# Altium PCB STM32H743I-EVAL2PCBDESIGN.PcbDoc (part 19 of 23)
Units mil, origin at the board's own origin, x right, y up, seen from the top; angles counter-clockwise.
Board outline 6558 x 5417 mil, 8 copper layers (L1_TOP, L2_GND, L3_HS1, L4_POWER, L5_SIG, L6_HS2, L7_GND, L8_BOTTOM), stack 61.368 mil thick; 620 components, 588 nets, 2945 pads, 1724 vias.
Unrouted connection lines stored in the file: 1.
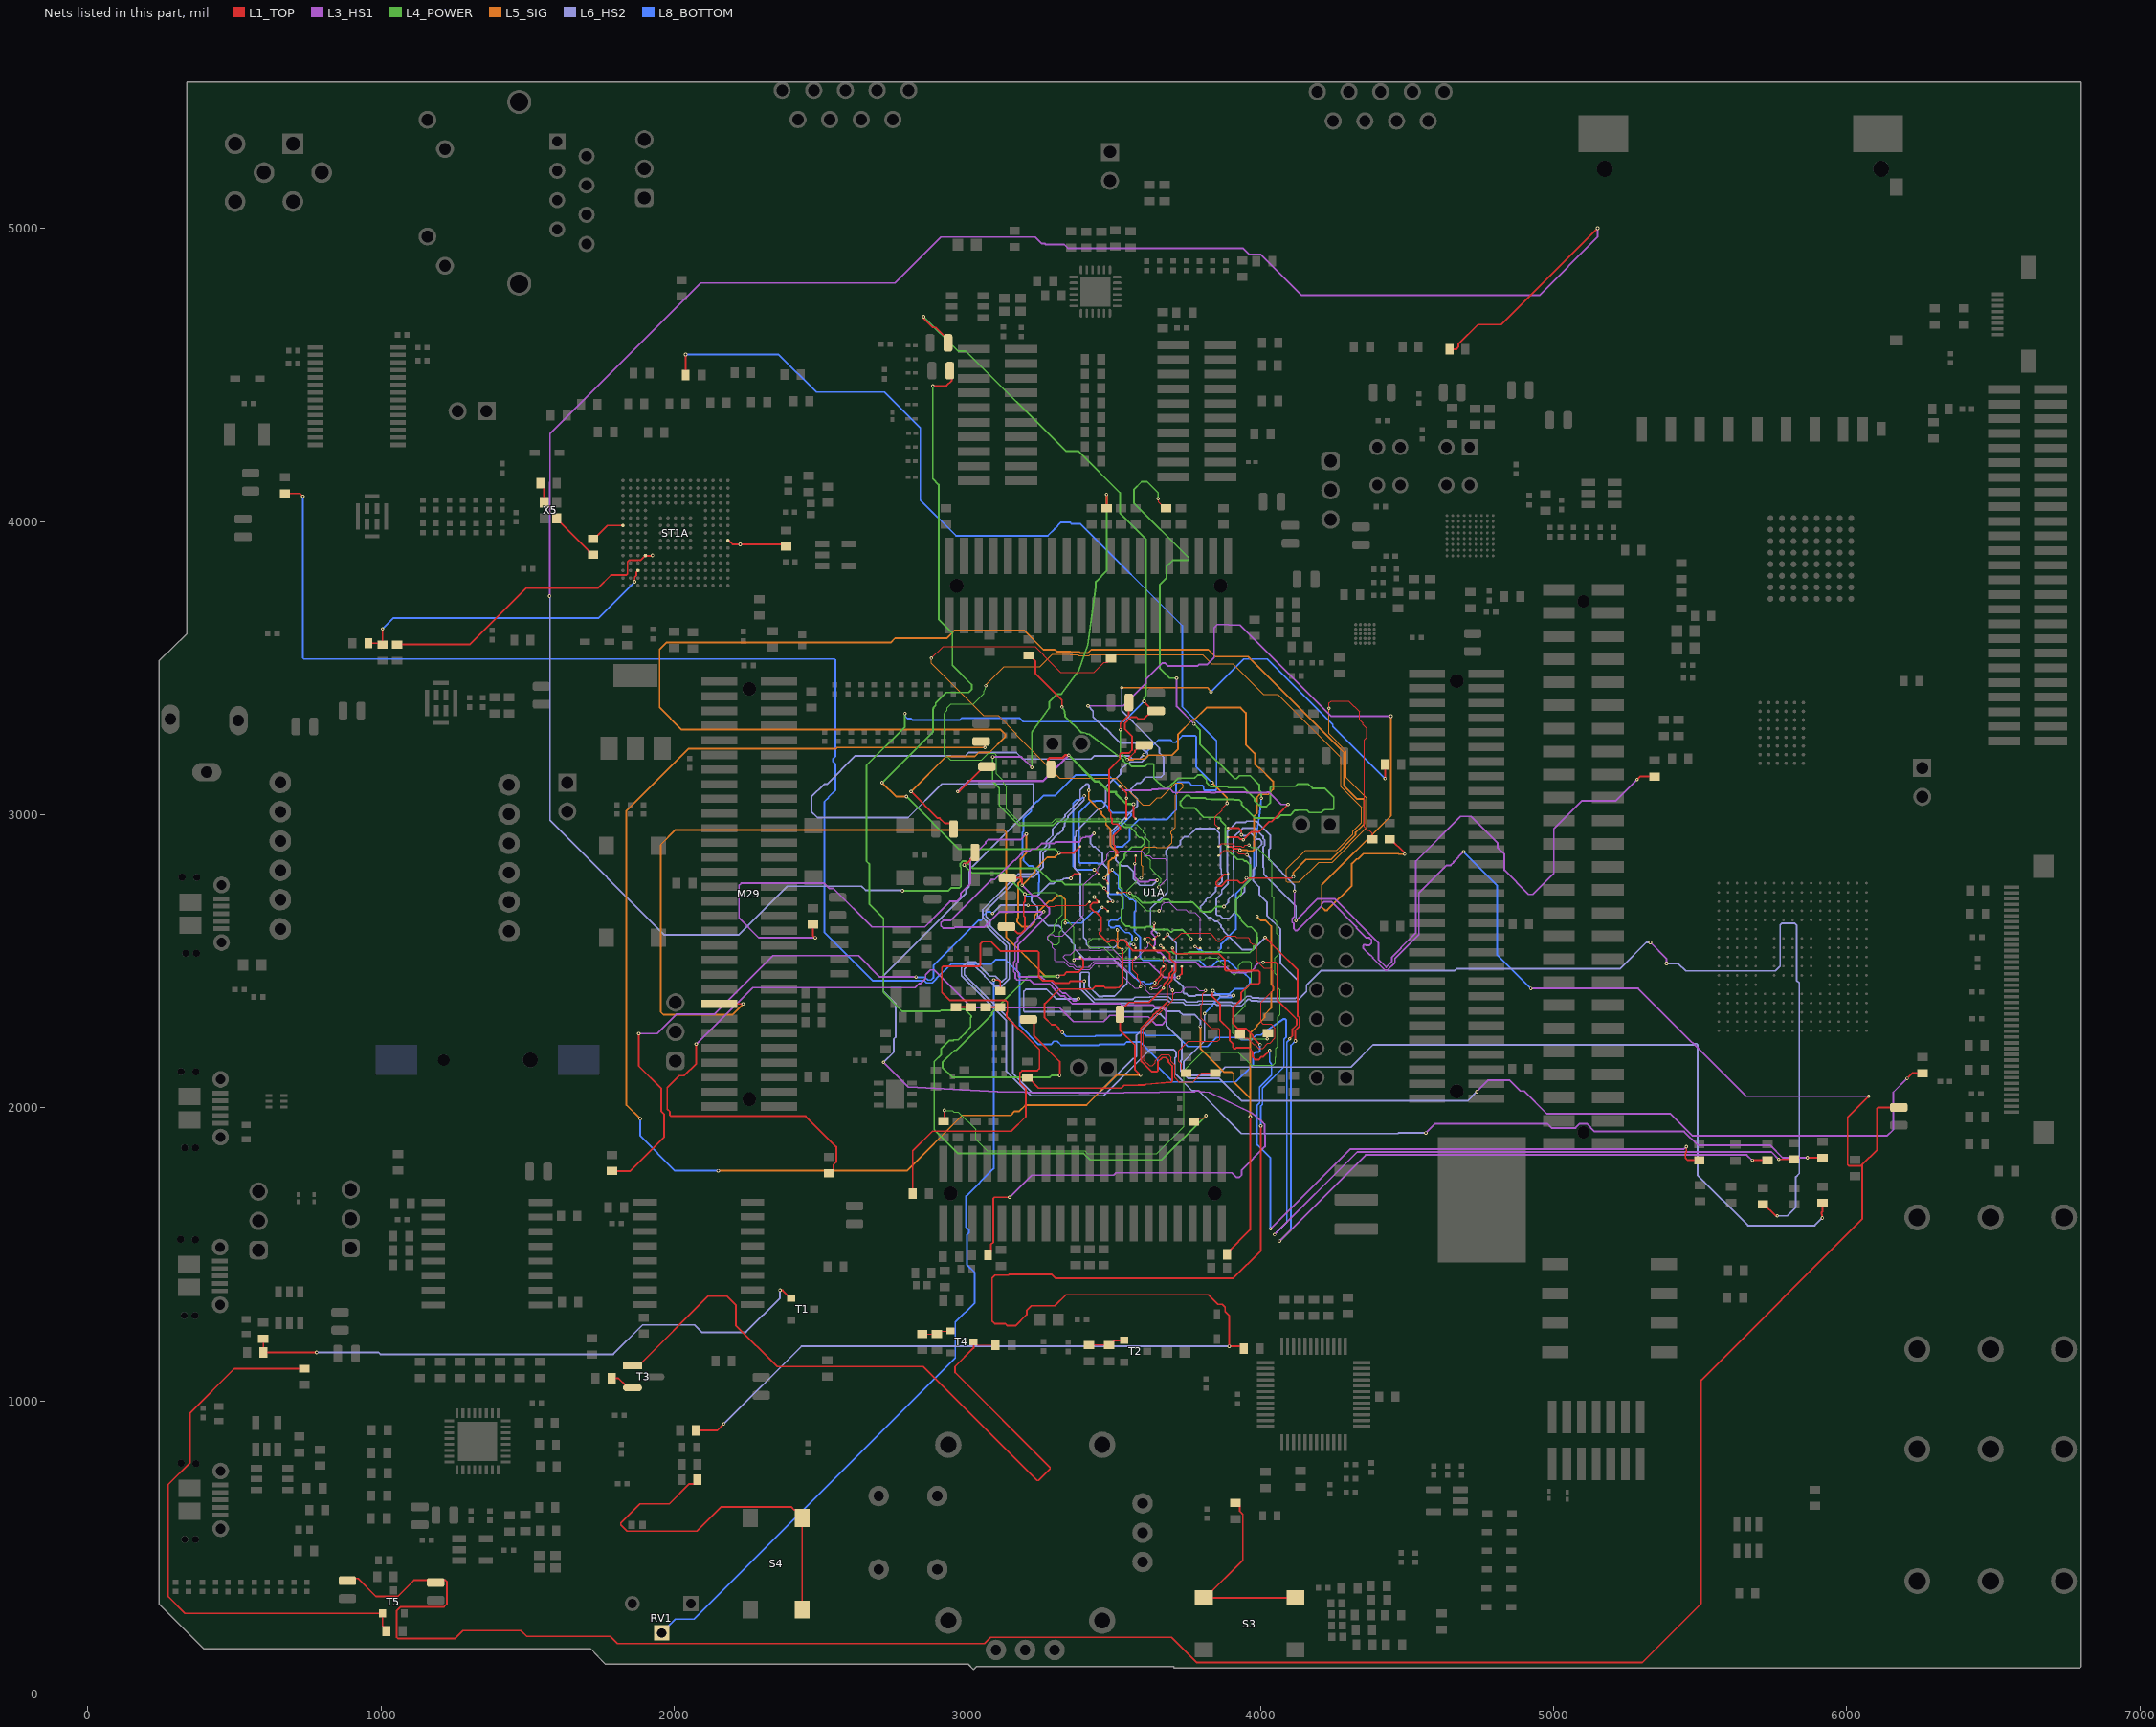
[diagram p16: the nets of this part, all layers, seen from the top]

## Via types
v1: diameter 12, hole 6, L1_TOP to L8_BOTTOM, tented both sides, 1724 vias

## Nets (pads, with @x,y where several pads share a name; then routed paths per layer and width w, separated by ;. In a path a pad name is that pad's centre, name@x,y a point inside that pad or via, vN(x,y) a via of type N, cw(c..) or ccw(c..) an arc to the next point about the centre after c; other vN are vias at no path point) (continued)
NetR54_2: R54.2 U1A.P13 | length 2554.8
  L1_TOP w6: R54.2@3475,4045.56 v1(3475,4093)
  L3_HS1 w6: v1(3087,3197) 3184.4,3197 v1(3220,3161.4)
  L4_POWER w6: v1(3087,3197) 3085.9,3195.9 3085.9,3113.1 3109,3090 3109,3030.82 3175.82,2964 3291.47,2964 3304.47,2977 3517.27,2977 3537.27,2957 3556.83,2957 3575.99,2937.84 3575.99,2932.57 3586.36,2922.2 3593.19,2922.2 3603.55,2911.84 3603.55,2901.07 3592.35,2889.87 3561.01,2889.87 3536,2864.86 3536,2851.38 3519.02,2834.41 3519.02,2754.62 3528,2745.64 3528,2721.82 3530.21,2719.61 3530.21,2680.6 3526,2676.38 3526,2634.61 3538.38,2622.23 3541.62,2619 3553.76,2619 3557.76,2615 3608.38,2615 3611.31,2617.92 3611.31,2618 3630.17,2618 3640.17,2608 3685.36,2608 3693.5,2599.86 3698.47,2599.86 3705.62,2607 3734.65,2607 3755.05,2586.6 3755.05,2586.1 3763,2578.15 v1(3763,2576.53) ; v1(3220,3161.4) 3220,3281.51 3278.89,3364.2 ccw(c3274,3367.68) 3280,3367.68 3280,3385.49 3305.19,3410.68 3319.36,3410.68 ; 3319.39,3410.68 3322.91,3414.19 3380,3491.62 3411,3579.62 3438,3776.12 3438,3794.38 3439.76,3796.14 3475,3831.38 v1(3475,4093)
NetR55_1: R55.1 U1A.P9 | length 4081.1
  L1_TOP w2: U1A.P9@3637.02,2576.53 v1(3651.98,2591.5)
  L1_TOP w6: v1(4016,2581) 4055.79,2541.21 4056.17,2541.21 4127,2470.38 4127,2312.56 4133.45,2306.12 4133.45,2278.78 4119,2264.33 v1(4119,2228) ; v1(5678.12,1820.88) R55.1@5730,1820.88
  L3_HS1 w6: v1(4065,1545) 4359,1839 5659.31,1839 5677.43,1820.88 v1(5678.12,1820.88)
  L6_HS2 w6: v1(3651.98,2591.5) 3624.54,2618.94 3624.54,2679.93 3651.91,2707.29 3654.68,2707.29 3682.04,2734.65 3682.04,2843.33 3681.48,2843.89 3681.48,2859.4 3678,2862.88 3678,2878.38 3688.62,2889 3716.66,2889 3727.03,2899.37 3727.03,2911.73 3740.26,2924.95 3752.86,2924.95 3780.9,2953 3844.3,2953 3860,2937.3 3860,2899.23 3863.96,2895.27 3863.96,2816.57 3866.48,2814.05 3866.48,2798.05 3869,2795.53 3869,2772.43 3848,2751.43 3848,2739.62 3825.38,2717 3820.62,2717 3813,2709.38 3813,2704.62 3800.41,2692.02 3800.41,2691.79 3795,2686.38 3795,2675.62 3821.54,2649.07 3830.5,2649.07 3843.57,2636 3852.53,2636 3866,2622.53 3866,2615.57 3874.43,2607.14 3874.43,2602.96 3938.38,2539 3974,2539 v1(4016,2581)
  L8_BOTTOM w6: v1(4065,1545) 4104,1584 4104,2213 v1(4119,2228)
NetR56_1: R56.1 SB13.1 SB14.1 U1A.D1 | length 5871.1
  L1_TOP w6: v1(2882,4463) 2928.31,4463 2947,4481.69 2947,4508 SB13.1@2940,4515 ; SB14.1@3137,2784 3182.73,2784 3187,2779.73 v1(3187,2759) ; v1(3313,2869) 3362.56,2869 U1A.D1@3385.05,2891.49 ; R56.1@3885.56,1500 3885.56,1503.94 3965,1583.38 v1(3965,1968.98)
  L3_HS1 w6: v1(3187,2759) 3223,2723 3237.38,2723 3279.32,2681.06 3279.32,2661.71 3173,2555.38 3173,2497 3168,2492 3168,2468.62 3174,2462.62 3174,2449.51 3177.51,2446 3253,2446 3265,2434 3282.81,2434 3314.62,2402.19 3314.62,2400.52 3324.14,2391 3335.66,2391 3361.66,2365 3372,2365 v1(3378.89,2371.89)
  L4_POWER w6: v1(2709.09,3109.09) 2883,3283 2883,3332.67 2883,3361.15 2884,3362.15 2884,3364.88 2892,3372.88 2892,3381.27 2927.73,3417 3004.38,3417 3014.74,3427.36 3014.74,3443.83 2949,3509.57 2949,3619 2902,3666 2902,4126.01 2882,4146.01 v1(2882,4463) ; v1(2792,3062) 2972,2882 3300,2882 v1(3313,2869)
  L5_SIG w6: v1(2709.09,3109.09) 2756.17,3062 v1(2792,3062) ; v1(3187,2759) 3230.57,2802.57 3230.57,2812.57 3273,2855 3299,2855 v1(3313,2869) ; v1(3795,2278) 3795,2202 3875,2122 3901.38,2122 3909,2114.38 3909,2088 3965,2032 ; v1(3965,1968.98) 3965,2032 ; v1(3989,2653) 3989,2651.38 3997.14,2643.24 3997.14,2642.86 4001.38,2638.62 4017.77,2638.62 4037,2619.38 4037,2419.38 4044.15,2412.24 4044.15,2401.47 4037,2394.32 4037,2340.62 4014,2317.62 4014,2307.23 3988,2281.23 3988,2277.47 3965,2254.47 3965,2032
  L6_HS2 w6: v1(3378.89,2371.89) 3302.49,2371.89 3270.38,2404 3199.62,2404 3192,2396.38 3192,2330.51 3195.51,2327 3628.33,2327 3640.33,2339 3667.67,2339 3677.67,2329 3723,2329 3724.98,2327.02 3734,2318 3775,2318 3795,2298 v1(3795,2278)
NetR57_2: R57.2 U1A.P14 | length 2695.5
  L1_TOP w2: v1(2877,3534) 2917.22,3574.22 3230.93,3574.22 3261,3544.15 3261,3542.44 3317.44,3486 3432.13,3486 3465.79,3519.66 3477.22,3519.66 R57.2@3490,3532.44
  L3_HS1 w2: v1(3654,2672) 3661.51,2679.51 3661.51,2684.76 3663.25,2690.41 3664.43,2691.59 3673.84,2701 3686,2701 3687.17,2702.17 3688.83,2702.17 3714.51,2676.49 3745.07,2676.49 3755.56,2666 3776.56,2666 3794.5,2648.06 v1(3794.5,2576.53)
  L4_POWER w2: v1(3592.92,2784) 3591,2782.09 3584.92,2782.09 3546,2743.17 3546,2741 3544,2739 3544,2728.44 3550.44,2722 3551,2722 3558,2715 3568.87,2715 3611.87,2672 v1(3654,2672)
  L5_SIG w2: v1(2877,3534) 2877,3516 3055,3338 3104.98,3338 3166.49,3276.49 3166.49,3272.51 3314,3125 3507.56,3125 3553,3079.56 3553,3079.44 3598.44,3034 3623.56,3034 3647.56,3058 3660.98,3058 3711.98,3109 3729.56,3109 3736,3102.56 3736,3093.44 3709,3066.44 3709,2956.56 3695,2942.56 3695,2933.44 3698.72,2929.72 3698.72,2904.82 3681.9,2888 3665,2888 3664.46,2887.46 3645.1,2887.46 3643.56,2889 3605.44,2889 3594,2877.56 3594,2828.44 3599,2823.44 3599,2790.64 3592.92,2784.56 v1(3592.92,2784)
NetR58_1: R58.1 U1A.N9 | length 3472.2
  L1_TOP w4: U1A.N9@3637.02,2608.02 v1@3637.02,2628.49
  L1_TOP w6: v1(4009,2496) 4051,2496 4057.72,2489.28 4057.72,2367.7 4123.45,2301.97 4123.45,2290.16 4123.45,2282.92 4109,2268.47 4109,2245.62 4100,2236.62 v1(4100,2235) ; v1(5768.12,1823.88) R58.1@5820,1823.88
  L3_HS1 w6: v1(3637.54,2629.02) 3637.54,2609.58 3628.98,2601.02 3628.98,2594.54 3640,2583.53 3640,2555.47 3636,2551.47 3636,2543.47 3649.47,2530 3657.86,2530 3690.86,2497 3749.33,2497 3750.33,2498 3777.67,2498 3795.67,2480 3882.72,2480 3901.72,2461 3931.86,2461 3951.8,2461 3954.8,2464 3967.53,2464 3981,2477.47 3981,2481.63 3994.22,2494.85 4007.85,2494.85 v1(4009,2496) ; v1(4048,1567) 4330,1849 5743,1849 v1(5768.12,1823.88)
  L8_BOTTOM w6: v1(4048,1567) 4090,1609 4090,2223.79 4100,2233.79 v1(4100,2235)
NetR59_2: R59.2 U1A.R14 | length 2265.3
  L1_TOP w2: v1(3777,2550) 3779.71,2550 3784.67,2545.03 U1A.R14@3794.5,2545.03
  L1_TOP w4: v1(3651,4078) 3652.53,4076.47 3652.53,4067.09 3674.06,4045.56 R59.2@3678,4045.56
  L3_HS1 w6: v1(3714,3466) 3714,3369 v1(3773,3310)
  L4_POWER w6: v1(3651,4078) 3651,4098.53 3613.53,4136 3594.47,4136 3568,4109.53 3568,4063.62 3755.13,3876.49 3755.13,3871.51 3751.62,3868 3700.62,3868 3678.81,3846.19 3678.81,3807.42 3657,3785.62 3657,3498.62 3689.62,3466 v1(3714,3466) ; v1(3773,3310) 3793.38,3289.62 3793.38,3241 3911.38,3123 3918.47,3123 3928.47,3133 3965.19,3133 3996.01,3102.18 3996.01,3083.4 4003,3076.41 v1(4003,3056)
  L8_BOTTOM w6: v1(3777,2550) 3777.44,2550 3787.83,2539.62 3796.86,2539.62 3805.47,2531 3852.53,2531 3866,2544.47 3866,2558.62 3915.78,2608.39 3915.78,2729.39 3978,2791.62 3978,2909.38 3982.25,2913.63 3984.01,2915.39 3998.01,3006.77 4000.77,3035.77 4000.77,3040.15 4001.85,3041.23 4001.85,3054.85 v1(4003,3056)
NetR60_1: R60.1 U1A.P10 | length 3590.7
  L1_TOP w2: U1A.P10@3668.51,2576.53 v1(3683.48,2591.5)
  L1_TOP w6: v1(5917,1624) 5915.85,1625.15 5915.85,1635.56 5913.86,1637.56 5913.86,1642 5917,1645.14 R60.1@5917,1675.88
  L6_HS2 w6: v1(3683.48,2591.5) 3713.01,2561.97 3713.01,2503.8 3707,2497.79 3707,2439.62 3721.12,2425.5 3722.88,2425.5 3737,2411.38 3737,2392.51 3740.51,2389 3747.85,2389 3755.85,2381 3776.9,2381 3779.9,2384 3859.64,2384 3863.64,2380 3887.01,2380 3890.01,2383 v1(3908,2383) ; v1(3809,2321) 3809,2227.67 3738,2156.67 3738,2129.33 3757.33,2110 3851,2110 3880,2139 4308.62,2139 4384.62,2215 5479,2215 5482.51,2218.51 5487.49,2218.51 5491,2215 5491,1770 5663,1598 5891,1598 v1(5917,1624)
  L8_BOTTOM w6: v1(3809,2321) 3837.07,2349.07 3837.07,2352.07 3861,2376 3899.38,2376 3906.38,2383 v1(3908,2383)
NetR61_2: R61.2 U1A.D16 | length 2455.7
  L1_TOP w4: R61.2@2919,1954.56 2921,1956.56 v1(2921,1991) ; U1A.D16@3857.49,2891.49 3866.49,2900.49 3904.61,2900.49 3911.6,2893.5 3932.73,2893.5 3936.23,2890 3942.84,2890 3948.6,2895.76 3960.36,2895.76 v1(3960.6,2896)
  L4_POWER w4: v1(2921,1991) 2948.72,1991 2953.72,1986 2968.69,1986 3028.66,1926.03 3028.66,1892.03 3067.69,1853 3400.73,1853 3410.07,1843.66 3645.62,1843.66 3739,1937.04 3739,2127.97 3801.03,2190 3924,2190 3969,2145 4043.31,2145 4051.41,2153.1 4051.41,2173.14 4052,2173.73 4052,2201.97 4059,2208.97 4059,2310.4 4067.15,2318.54 4067.15,2401.48 4059.15,2409.48 4059.15,2448.22 4049,2458.36 4049,2511.25 4054,2516.25 4062.5,2524.75 4062.5,2588.33 4056,2594.83 4056,2635.05 4046,2645.05 4046,2715.1 4039,2722.1 4039,2837 3987.88,2888.12 3968.48,2888.12 v1(3960.6,2896)
NetR62_1: R62.1 U1A.R10 | length 3172.6
  L1_TOP w2: v1(3659,2553) 3659.77,2553 3667.74,2545.03 U1A.R10@3668.51,2545.03
  L1_TOP w6: R62.1@3209,3543.44 3212.94,3543.44 3231.82,3524.56 3231.82,3482.04 3323,3390.86 v1(3323,3367.68)
  L4_POWER w6: v1(3323,3367.68) 3332.14,3352.47 3333,3335.43 3387.46,3280.97 cw(c3389,3242) 3409.24,3275.34 3416.45,3274.15 3530.59,3188.87 3533,3186.46 3533,3182.62 3540.62,3175 3549.77,3175 3559.77,3165 3606.38,3165 3614.58,3173.19 3632.68,3173.19 3636.19,3169.68 3636.19,3125.19 3671.61,3089.77 3684.24,3089.77 3719.47,3125 3775.47,3125 3785.47,3135 3800.53,3135 3816,3119.53 3816,3109.62 3829.62,3096 3886.62,3096 3890.62,3092 3942.95,3092 3980,3054.95 3980,3046.47 3993.47,3033 3996.47,3033 4001.47,3028 4020.53,3028 4034,3041.47 4034,3093.49 4037.51,3097 4119.55,3097 4126.55,3104 4163.53,3104 4177.53,3090 4219,3090 4250,3059 4250,3020.51 4246.49,3017 4218.58,3017 4216.91,3015.33 4215.48,3015.33 4207.14,3007 4167.42,3007 4159.09,3015.33 4126.86,3015.33 4126.53,3015 4118.15,3015 4101.15,2998 4068.33,2998 4058.33,2988 3981.9,2988 3936.01,3033.9 3936.01,3042.38 3928.39,3049.99 3910.39,3049.99 3908.38,3052 3834.38,3052 3833.38,3053 3816.05,3053 3812.05,3057 3764.39,3057 3756.38,3065 3745.62,3065 3739.1,3058.48 3739.1,3057.31 3727,3045.21 3727,3032.61 3736.62,3023 3774.3,3023 3806.3,2991 3859.23,2991 3864.5,2985.73 3864.5,2979.23 3881,2962.73 3881,2955.27 3880,2954.27 3880,2898.53 3886.11,2892.42 3886.11,2882.14 3921.24,2847 3932.03,2847 3940.3,2847 3945.3,2842 3951.38,2842 3965,2828.38 3965,2777.39 3935,2747.39 3935,2729.53 3915.78,2710.31 3915.78,2664.96 3918,2662.74 3918,2662.62 3931.37,2649.24 3931.37,2647.1 3935,2643.47 3935,2637.87 3955.87,2617 3968.39,2617 3989,2596.38 3989,2582 3990,2581 3990,2563.81 3977,2550.81 3977,2542.47 3963.53,2529 3869.43,2529 3867.43,2531 3840.15,2531 3839.15,2532 3806.85,2532 3805.85,2531 3755.61,2531 3751.61,2527 3738.52,2527 3737.29,2525.77 3704.09,2525.77 3697.84,2532.03 3679.97,2532.03 v1(3659,2553)
NetR63_1: R63.1 SB15.1 SB16.1 U1A.E5 | length 6299.9
  L1_TOP w4: R63.1@3772,1952.56 3783.78,1964.34 3805.34,1964.34 v1(3814,1973)
  L1_TOP w6: v1(2851,4699) 2851,4693 2881.5,4662.5 2891.84,4662.5 2934,4620.34 SB15.1@2934,4610 ; U1A.E5@3511.03,2859.99 3511.03,2876.82 3502.6,2885.25 3502.6,2894.01 3498,2898.62 3498,2926.78 3521.03,2949.81 3521.03,2958.62 3511.68,2967.98 3496.55,2967.98 3493.03,2971.49 3493.03,2986.62 3489.54,2990.12 3489.54,3007.09 3484,3012.63 3484,3154.38 3520.47,3190.86 3520.47,3206.68 3523.99,3210.2 3551.67,3210.2 3561.63,3220.16 3561.63,3268.1 3537,3292.73 3537,3311.38 3558.62,3333 3576.62,3333 3583.66,3325.96 3600.96,3325.96 3629,3354 SB16.1@3633.66,3354 ; v1(3603,3387) 3604.96,3385.04 3604.96,3382.7 SB16.1@3633.66,3354 ; SB16.1@3644,3354 SB16.1@3633.66,3354
  L4_POWER w6: v1(2787,3345) 2787,3300 2656,3169 2656,2840.67 2666.16,2830.51 2666.16,2693.7 2714,2645.86 2714,2393 2778,2329 2906.67,2329 2909.67,2332 2941.81,2332 2945.81,2336 2990.59,2336 3013.51,2313.07 3013.51,2309.51 3011,2307 3011,2275.19 2998.91,2263.09 2998.91,2260.91 2977.19,2239.19 2975.9,2239.19 2968.42,2231.71 2954.33,2231.71 2951.62,2229 2937.47,2229 2911,2202.53 2911,2181.62 2887,2157.62 2887,1925 2968,1844 3397,1844 3419,1822 3663,1822 v1(3814,1973) ; v1(2851,4699) 2968.38,4581.62 2994.75,4581.62 3335.62,4240.75 3378.64,4240.75 3521,4098.38 3521,4028.53 3609,3940.53 3609,3406.5 3603,3400.5 v1(3603,3387)
  L8_BOTTOM w6: v1(2787,3345) 2788.15,3343.85 2788.15,3335.31 2795.46,3328 2808,3328 2813,3323 2974.14,3323 2981.14,3330 3097.53,3330 3098.24,3329.28 3179.1,3329.28 3190.77,3317.62 3533.62,3317.62 v1(3603,3387)
NetR64_2: R64.2 U1A.B17 | length 3636.1
  L1_TOP w6: R64.2@2813.44,1707 2813.44,1852.44 2881.22,1920.22 3149.9,1920.22 3199.57,1969.89 3199.57,2065.48 3179.28,2085.76 3179.28,2119.12 3186.72,2126.56 3238.56,2126.56 3246,2134 3246,2198.35 3133.78,2310.57 3133.78,2323.83 3136.72,2326.76 3136.72,2360.12 3130.84,2366 2941,2366 2913,2394 2913,2478.77 2916.51,2482.28 3040.77,2482.28 3044.28,2485.8 3044.28,2558.77 3052.51,2567 3080.75,2567 3112.75,2535 3238.63,2535 3244,2529.63 3244,2446.14 3257.14,2433 3291.47,2433 3299.47,2425 3344.92,2425 3351.92,2432 v1(3399,2432) ; U1A.B17@3888.98,2954.48 3924.45,2954.48 3934.85,2944.08 v1(3934.85,2931.15)
  L6_HS2 w6: v1(3399,2432) 3399,2405.62 3434.62,2370 3564.86,2370 3571.86,2377 3621.76,2377 3623.76,2379 3685.86,2379 3691.86,2373 3692.1,2373 3696.1,2369 3739.57,2369 3747.57,2361 3785.19,2361 3788.19,2364 3851.36,2364 3855.36,2360 3901.81,2360 3904.81,2357 3930.05,2357 3953.66,2380.62 3966,2380.62 3971.62,2375 3993.81,2375 3995.81,2373 4119.38,2373 4127,2380.62 4127,2433.62 4068,2492.62 4068,2609.86 4022,2655.86 4022,2701.38 3996,2727.38 3996,2753.38 3975,2774.38 3975,2813.14 3987,2825.14 3987,2881.62 4004,2898.62 4004,2909.38 3996.38,2917 3987.38,2917 3967.46,2936.93 3962.49,2936.93 3953.38,2927.83 3942.62,2927.83 3940.44,2930 3936,2930 v1(3934.85,2931.15)
NetR66_1: R66.1 U1A.T10 | length 867.7
  L1_TOP w4: v1(3626,2406) 3634.78,2414.78 3643.75,2414.78 3651.15,2422.18 3651.15,2426.42 3653,2428.27 3653,2430.89 3656,2433.89 3656,2434.57 3668,2446.57 3668,2463.71 3677,2472.71 3677,2474.13 3677.51,2474.65 3677.51,2485.77 3668.51,2494.77 U1A.T10@3668.51,2513.54 ; v1(3700,2401) 3701,2400 3701,2367.54 3651.46,2318 3649.03,2318 3642,2310.97 3642,2308.54 3601,2267.54 3601,2210.87 3602.28,2209.59 3602.28,2161.75 3621.03,2143 3630.97,2143 3641.09,2153.11 3641.09,2159.87 3661.89,2180.67 3686.33,2180.67 3695.45,2171.55 3695.45,2158.67 3708,2146.12 3708,2102.32 3721.66,2088.66 3770.34,2088.66 3800.12,2118.44 R66.1@3846,2118.44
  L3_HS1 w4: v1(3626,2406) 3650.03,2406 3664.03,2420 3688.66,2420 3691,2417.66 3691,2410 v1(3700,2401)
NetR68_2: R68.2 U1A.B16 | length 6539.4
  L1_TOP w4: U1A.B16@3857.49,2954.48 3845,2966.97 3845,2992.26 3868.85,3016.11 3868.85,3021.26 3886,3038.41 v1(3886,3039)
  L1_TOP w6: R68.2@3070.56,1498 3079.88,1507.32 3079.88,1532.47 3089,1541.58 3089,1691.49 3092.51,1695 v1(3144.26,1695)
  L3_HS1 w6: v1(2714,2155) 2798.24,2070.76 3102.86,2055.01 3103.02,2055 3382.02,2050 3415.98,2050 3775.62,2055 3778.62,2058 3789.38,2058 3792.38,2055 3825.67,2052 3970.38,1981.98 4006.53,1951.14 4014.14,1943.53 4015.24,1872.21 4015.24,1867.24 3936,1788 3936,1770.62 3928.38,1763 3917.62,1763 3902.69,1777.92 3507.32,1777.92 3499.4,1770 3219.26,1770 v1(3144.26,1695)
  L5_SIG w6: v1(3835,3109) 3886,3058 v1(3886,3039)
  L6_HS2 w6: v1(2714,2155) 2749,2190 2749,2234.38 2756,2241.38 2756,2354.05 2714,2396.05 2714,2450.86 2996,2732.86 2996,2744.12 3006,2754.12 3006,2811.84 3226,3031.84 3226,3101.49 3222.49,3105 2912.98,3105 2797.98,2990 2488.47,2990 2468,3010.47 2468,3060.38 2511.62,3104 2521,3104 2618,3201 2944.62,3201 2946.62,3199 2991.5,3199 3004.5,3212 3166.94,3212 3188.94,3190 3422.38,3190 3433.38,3201 3551.38,3201 3562.38,3190 3587,3190 v1(3602,3205)
  L8_BOTTOM w6: v1(3602,3205) 3651.62,3254.62 3693,3254.62 3700.62,3247 3711.38,3247 3733.38,3269 3777.49,3269 3781,3265.49 3781,3163 v1(3835,3109)
NetR69_1: R69.1 U1A.U10 | length 4761.6
  L1_TOP w6: R69.1@2038.88,4500 2039,4500.12 v1(2039,4570) ; v1(3639,2427) 3639,2428.62 3644,2433.62 3644,2434.62 3647,2437.62 3647,2438.3 3659,2450.3 3659,2472.53 U1A.U10@3668.51,2482.04
  L8_BOTTOM w6: v1(2039,4570) 2356.47,4570 2484.64,4441.83 2717.55,4441.83 2839.44,4319.94 2839.44,4073.39 2961.33,3951.5 3274.53,3951.5 3298,3974.97 3298,3975.88 3319.62,3997.5 3350,3997.5 3355.5,3992 3385.88,3992 3733.23,3644.65 3733.23,3368.16 3850,3251.38 3850,3086.51 3846.49,3083 3809.51,3083 3806,3086.51 3806,3095.49 3802.49,3099 3767.05,3099 3755.05,3111 3719.62,3111 3712,3103.38 3712,3068.64 3713,3067.64 3713,3016.33 3679.67,2983 3584.16,2983 3554,2952.84 3554,2914.51 3530.49,2891 3505.62,2891 3498,2898.62 3498,2936.53 3558.99,2997.52 3558.99,3002.49 3555.47,3006 3495.47,3006 3478,3023.47 3478,3028.38 3459.38,3047 3437.53,3047 3436.53,3046 3420,3046 3381,3007 3381,2838.48 3384.51,2834.97 3442.6,2834.97 3444.57,2833 3462.38,2833 3481.5,2813.88 3481.5,2735.02 3487.73,2728.8 3522.2,2728.8 3531,2720 3531,2681.38 3526,2676.38 3526,2655 3512.24,2641.24 3490.86,2641.24 3489.31,2639.69 3483,2633.38 3483,2622.62 3490.62,2615 3501.38,2615 3505.38,2619 3517.38,2619 3539,2597.38 3552,2597.38 3562,2587.38 3562,2570.38 3554,2562.38 3554,2462.2 3585.39,2430.81 3600.49,2430.81 3609.29,2422 3624.38,2422 3628.24,2425.85 3637.85,2425.85 v1(3639,2427)
NetR71_1: R71.1 U1A.R11 | length 6088.1
  L1_TOP w6: R71.1@672,4095.88 723.12,4095.88 v1(733,4086) ; v1(3700.01,2545.03) 3700.55,2544.48 3700.55,2536.45 3711.23,2525.77 3857.98,2525.77 3878.98,2504.77 3878.98,2470.74 3882.5,2467.23 3993.93,2467.23 3997.45,2463.71 3997.45,2426.86 3993.62,2423.03 3965.65,2423.03 3934,2391.38 3934,2369.11 3905.28,2340.39 3905.28,2287.88 3922.53,2270.63 3950.21,2270.63 3974.03,2246.81 3974.03,2239.97 v1(3999,2215)
  L8_BOTTOM w6: v1(733,4086) 733,3534.88 736.51,3531.37 2546.49,3531.37 2550,3527.85 2550,3199.38 2542,3191.38 2542,3180.62 2550,3172.62 2550,3084.31 2526,3060.31 2526,3057.86 2512,3043.86 2512,2598.62 2677.62,2433 2854.47,2433 2861.47,2426 2880.53,2426 2894,2439.47 2894,2440.36 2943.64,2490 3081.38,2490 3096.38,2505 3130.97,2505 3178.49,2457.49 3178.49,2280.51 3243,2216 3284.62,2216 3295.62,2227 3306.38,2227 3320.38,2213 3447.44,2213 3450.44,2216 3534.94,2216 3543.94,2225 3588.53,2225 3649,2164.53 3649,2141 3702,2088 3916,2088 3975,2147 3975,2182.38 3982.62,2190 3994.49,2190 3998,2193.51 3998,2214 v1(3999,2215)
NetR73_1: R73.1 U1A.G4 | length 3622
  L1_TOP w2: U1A.G4@3479.54,2797 v1(3494.5,2811.97)
  L1_TOP w6: v1(3838,2399) 3836.85,2397.85 3836.85,2388.85 3835,2387 3835,2381 3862,2354 3862,2298.64 3895.28,2265.35 3895.28,2228.62 3905.28,2218.62 3905.28,2206.5 3910.03,2201.76 3915,2201.76 3918.57,2205.33 3958.62,2205.33 3973.72,2190.24 3973.72,2172.9 3982.62,2164 3993.38,2164 4003.38,2174 4010,2174 v1(4031,2195) ; v1(5453,1867) 5453,1848.19 5450,1845.19 5450,1828 5457.12,1820.88 R73.1@5497,1820.88
  L3_HS1 w6: v1(4034,1587) 4035,1587 4307,1859 5445,1859 v1(5453,1867)
  L8_BOTTOM w6: v1(3494.5,2811.97) 3516,2790.47 3516,2749.14 3554.14,2711 3564.38,2711 3574,2701.38 3574,2673.01 3570,2669.01 3570,2601.38 3590,2581.38 3590,2512.51 3599.51,2503 3791.05,2503 3814.05,2480 3832.23,2480 3853.23,2501 3864.95,2501 3866.95,2503 3889.47,2503 3931.47,2461 3943.53,2461 3963,2441.53 3963,2422.47 3945.69,2405.16 3911.78,2405.16 3894.47,2387.85 3848.76,2387.85 3838,2398.62 v1(3838,2399) ; v1(4031,2195) 4031,2156.05 4038,2149.05 4038,2111.72 3997,2070.72 3997,2016.75 3988.14,2007.9 3988.14,1873.86 4034,1828 v1(4034,1587)
NetR74_1: R74.1 U1A.G3 | length 5565.9
  L1_TOP w2: v1(3433.07,2811.97) U1A.G3@3448.04,2797
  L1_TOP w6: v1(6206,2100) 6223.9,2117.9 R74.1@6258.49,2117.9
  L3_HS1 w6: v1(4738,2055) 4777,2094 4849.38,2094 4886.38,2057 4899.67,2057 4977.17,1979.5 5399.05,1979.5 5474.55,1904 6137.67,1904 6159,1925.33 6159,2053 v1(6206,2100)
  L6_HS2 w6: v1(3399,3064) 3397.85,3062.85 3397.85,3050.04 3343.5,2995.69 3343.5,2989.78 3333.62,2979.9 3333.62,2972.33 3332,2970.71 3332,2961.51 3327,2956.51 3327,2948.62 3313.23,2934.85 3310.37,2934.85 3280,2904.47 3280,2890.53 3258,2868.53 3258,2820.19 3225.81,2788 3178.47,2788 3063,2672.53 3063,2653.47 3077,2639.47 3077,2622.62 3143,2556.62 3143,2440.47 3116.53,2414 3093.62,2414 3059.43,2448.19 3059.43,2450.1 3022.53,2487 3003.47,2487 2990,2473.53 2990,2454.47 3156,2288.47 3156,2115.86 3220.86,2051 3448.59,2051 3566,2168.41 3568.8,2168.41 3577,2176.62 3577,2247.38 3648.62,2319 3659.38,2319 3679,2299.38 3679,2280.62 3732,2227.62 3732,2164.81 3728,2160.81 3728,2125.19 3753.19,2100 3859.62,2100 3936.04,2023.57 4706.57,2023.57 v1(4738,2055)
  L8_BOTTOM w6: v1(3399,3064) 3385.76,3050.76 3373.09,3050.76 3361,3038.66 3361,2824.34 3373.37,2811.97 v1(3433.07,2811.97)
NetR75_1: R75.1 U1A.G1 | length 4906
  L1_TOP w6: v1(3353,2783) 3353,2784.62 3360.21,2791.84 3360.21,2792.76 3364.46,2797 U1A.G1@3385.05,2797 ; R75.1@5714,1670.88 5717.94,1670.88 5756.67,1632.15 5761.85,1632.15 v1(5763,1631)
  L3_HS1 w6: v1(5330,2564) 5385,2509 v1(5385,2492)
  L6_HS2 w6: v1(3353,2783) 3338,2783 3337,2782 3328.67,2782 3323.73,2777.06 3320,2777.06 3317.36,2774.43 3303.91,2774.43 3294.49,2765 3279.62,2765 3237.62,2723 3226.62,2723 3219,2715.38 3219,2704.62 3239.72,2683.9 3239.72,2651.9 3243.23,2648.38 3248.93,2648.38 3276.29,2621.02 3313.06,2621.02 3322.83,2611.25 3322.83,2604.79 3355,2572.63 3355,2565.53 3366,2554.53 3366,2541.43 3401.43,2506 3498.86,2506 3545,2459.86 3545,2424.47 3501.53,2381 3463.62,2381 3462.62,2380 3448.62,2380 3415,2413.62 3415,2449.5 3416,2450.5 3416,2458.63 3412.49,2462.14 3389.51,2462.14 3386,2458.63 3386,2404.47 3433.47,2357 3566,2357 3572,2363 3621.9,2363 3627.9,2369 3680.1,2369 3686.1,2363 3687.95,2363 3691.95,2359 3735.43,2359 3743.43,2351 3789.33,2351 3792.33,2354 3847.22,2354 3851.22,2350 3897.67,2350 3900.67,2347 3934.19,2347 3957.19,2370 3962.47,2370 3967.47,2365 3989.67,2365 3991.67,2363 4123.53,2363 4157,2396.47 4157,2417.5 4207.5,2468 4289.67,2468 4289.75,2468.07 ccw(c4292,2503) 4292.01,2468 4662.62,2468 4668.62,2474 5226,2474 5316,2564 v1(5330,2564) ; v1(5385,2492) 5425.67,2492 5450.67,2467 5756.73,2467 5773,2483.27 5773,2624 5778,2629 5822.97,2629 5829,2622.97 5829,2434.38 5838,2425.38 5838,1775.5 5826.49,1763.98 5826.49,1660 5797.49,1631 v1(5763,1631)
NetR76_1: R76.1 U1A.H4 | length 5012.8
  L1_TOP w2: v1(3467,2784) 3478.22,2772.78 3478.22,2766.82 U1A.H4@3479.54,2765.5
  L1_TOP w6: v1(5866.12,1829.44) R76.1@5918,1829.44
  L3_HS1 w6: v1(4564,1914) 4595.46,1945.46 4833.4,1945.46 4833.86,1945 4834.32,1945.46 4978.78,1945.46 4993.24,1931 5074.97,1931 5089.43,1945.46 5113.87,1945.46 5140.33,1919 5445.41,1919 5492.41,1872 5738.38,1872 5780.94,1829.44 v1(5866.12,1829.44)
  L5_SIG w6: v1(3414,3083) 3414,3052.62 3457,3009.62 3457,3002.05 3473,2986.05 3473,2966.73 3488,2951.73 3488,2894.47 3506,2876.47 3506,2858.62 3498.38,2851 3493.62,2851 3481.5,2838.89 3481.5,2798.5 v1(3467,2784)
  L6_HS2 w6: v1(3414,3083) 3415,3084 3415,3101.28 3411.49,3104.8 3406.51,3104.8 3385,3083.28 3385,3051.33 3333.5,2999.83 3333.5,2994.03 3291,2951.53 3291,2929.62 3270,2908.62 3270,2894.67 3248,2872.67 3248,2824.33 3221.67,2798 3174.33,2798 3053,2676.67 3053,2649.33 3067,2635.33 3067,2618.47 3133,2552.47 3133,2444.62 3118.87,2430.49 3113.9,2430.49 3095.38,2449 3076.64,2449 3028.64,2497 2999.33,2497 2980,2477.67 2980,2450.33 3133,2297.33 3133,2124.72 3216.72,2041 3465.33,2041 3622.33,2198 3704.38,2198 3712,2190.38 3712,2173.1 3708,2169.1 3708,2116.9 3766.9,2058 3789.38,2058 3935.38,1912 4468.38,1912 4470.38,1914 v1(4564,1914)
NetR77_1: R77.1 U1A.J5 | length 3282.1
  L1_TOP w4: U1A.J5@3511.03,2734.01 3529.84,2734.01 3532.84,2737 3540.84,2737 3543.3,2734.53 3553.47,2734.53 v1(3555,2733)
  L1_TOP w6: v1(5285,3120) 5295,3130 R77.1@5344,3130
  L3_HS1 w6: v1(4121,2639) 4195,2713 4252.53,2713 4402.11,2563.42 4402.11,2505.89 4428.69,2479.31 4448.76,2499.38 4448.76,2513.52 4479,2543.76 4479,2546 4530.31,2597.31 4530.31,2841.56 4682.75,2994 4718.38,2994 4809.47,2902.92 4809.47,2887.08 4832,2864.55 4832,2810.62 4914.62,2728 4928.6,2728 4994,2793.4 4994,2793.53 5001,2800.53 5001,2952.38 5095.62,3047 5212,3047 v1(5285,3120)
  L4_POWER w6: v1(3555,2733) 3556.21,2733 3566.21,2723 3572.18,2723 3595.17,2700.02 3629.31,2700.02 3630.29,2701 3657.47,2701 3667.47,2711 3686.53,2711 3696.53,2701 3769.62,2701 3802.61,2668 3830.08,2668 3848.57,2686.5 v1(3875.5,2686.5)
  L6_HS2 w6: v1(3875.5,2686.5) 3890,2701 3890,2710.17 3909,2729.17 3909,2812.1 3907,2814.1 3907,2921.68 3939.31,2953.99 3981.01,2953.99 4009,2926 4009,2918.53 4014,2913.53 4014,2894.47 4009,2889.47 4009,2821.05 4011.37,2818.67 4011.37,2796.96 4121,2687.33 v1(4121,2639)
NetR79_1: R79.1 U1A.J4 | length 8327.8
  L1_TOP w2: v1(3467,2749) 3467,2747.77 3479.54,2735.24 U1A.J4@3479.54,2734.01
  L1_TOP w6: R79.1@4644.44,4588 4667.22,4588 4675.05,4595.83 4675.05,4604.89 4742.16,4672 4821,4672 v1(5149.93,5000.93)
  L3_HS1 w6: v1(1575,3746) 1575,4132.83 1576,4133.83 1576,4300 2090,4814 2752.38,4814 2909.38,4971 3230.67,4971 3252.36,4949.31 3263.31,4949.31 3266.62,4946 3330.14,4946 3343.14,4933 3940,4933 3961,4912 4000,4912 4139,4773 4946,4773 4946.51,4772.49 4951.49,4772.49 5149.93,4970.93 v1(5149.93,5000.93)
  L4_POWER w6: v1(2778.83,2740.17) 2934.64,2740.17 2944.47,2750 2972.49,2750 2978.43,2755.95 2978.43,2820.18 2976,2822.62 2976,2833.38 2983.62,2841 2994.38,2841 3018.38,2817 3240.16,2817 3285.16,2772 3322.62,2772 3332.62,2762 3454,2762 v1(3467,2749)
  L6_HS2 w6: v1(1575,3746) 1576,3745 1576,2980.62 1966.62,2590 2219.9,2590 2385.73,2755.83 2639.02,2755.83 2652.85,2742 2777,2742 v1@2780.66,2738.34
NetR80_1: R80.1 U1A.K2 | length 2445.4
  L1_TOP w4: v1(3207,2691) 3270.57,2691 3273.57,2688 3298.03,2688 3300.03,2690 3404.03,2690 U1A.K2@3416.54,2702.51
  L1_TOP w6: R80.1@1787,1783.88 1849.88,1783.88 1966,1900 1966,1961.72 1965,1962.72 1965,1978.19 1956,1987.19 1956,2065.5 1879,2142.5 v1(1879,2253)
  L3_HS1 w6: v1(1879,2253) 1942.14,2253 2008.65,2319.5 2138.01,2319.5 2337.5,2519 2628.38,2519 2701.38,2446 v1(2825,2446)
  L6_HS2 w6: v1(3086,2663) 3114,2691 v1(3207,2691)
  L8_BOTTOM w6: v1(2825,2446) 2826.15,2444.85 2856.76,2444.85 2865.62,2436 2876.38,2436 2884,2443.62 2884,2485.38 3038.24,2639.62 3046.52,2639.62 3052.38,2645.48 3052.38,2653.76 3067.62,2669 3078.38,2669 3084.38,2663 v1(3086,2663)
NetR81_1: R81.1 U1A.K3 | length 1626.2
  L1_TOP w6: R81.1@3204,2102.44 3207.94,2102.44 3243.38,2067 3525.17,2067 3535.17,2077 3570.28,2077 3582.61,2077.98 cw(c3583.09,2072) 3583.09,2078 3604.67,2078 3605,2078.33 cw(c3609.24,2074.09) 3608.74,2080.07 3695.49,2087 3697.1,2088.61 3697.24,2088.75 3699,2090.51 3699,2142.39 3686.45,2154.94 3686.45,2161.6 3676.38,2171.67 3665.62,2171.67 3650.09,2156.14 3650.09,2126.9 3646.57,2123.39 3627.91,2123.39 3593.28,2158.02 3593.28,2205.86 3592,2207.14 3592,2271.27 3633,2312.27 3633,2314.7 3645.3,2327 3647.73,2327 3682,2361.27 3682,2418.88 3690,2426.88 3690,2427.56 3697,2434.56 3697,2442 3699,2444 3699,2453.7 3710.01,2464.71 3710.01,2490.81 3691.01,2509.81 3691.01,2524.22 3678.63,2536.6 3564.07,2536.6 3546.06,2554.62 3546.06,2559.89 3532.94,2573 3522.17,2573 3514.56,2565.38 3509.06,2565.38 3501.45,2573 3490.68,2573 3482.8,2565.12 3477.83,2565.12 3449.93,2593.02 3449.93,2597.99 3456.47,2604.53 3456.47,2649.48 3438.46,2667.49 3433.18,2667.49 3420.07,2680.6 3420.07,2691.37 3427.69,2698.98 3443.74,2698.98 3447.27,2702.51 U1A.K3@3448.04,2702.51 3433,2717.55 v1(3433,2719)
NetR83_1: R83.1 U1A.K4 | length 5025.8
  L1_TOP w2: U1A.K4@3479.54,2702.51 3480.28,2703.26 3495.26,2703.26 v1(3496,2704)
  L1_TOP w6: v1(2075,2217) 2075,2150.78 2033.73,2109.5 2017.5,2109.5 1976,2068 1976,1995.47 1985,1986.47 1985,1974.51 1988.51,1971 2448.38,1971 2552.72,1866.67 2552.72,1814.88 2542.72,1804.88 2542.72,1787.22 2531.94,1776.44 R83.1@2528,1776.44
  L3_HS1 w6: v1(2075,2217) 2268,2410 2821.53,2410 2835.53,2424 2841,2424 2857.31,2440.31 2857.31,2453.69 2873.62,2470 2887,2470 3016,2341 3314.95,2341 3361.95,2294 3465.47,2294 3482.47,2311 3486.47,2315 3505.53,2315 3509.53,2311 3510.53,2310 3617.47,2310 3644.47,2283 3663.53,2283 3677,2296.47 3677,2338 3671,2344 3640.04,2344 3634.04,2350 3527.1,2350 3522.1,2355 3357.52,2355 3331.52,2381 3320,2381 3299,2402 3299,2403.67 3279.67,2423 3226,2423 3213,2436 3169.86,2436 3164,2441.86 3164,2458.47 3158,2464.47 3158,2496.14 3163,2501.14 3163,2559.53 3172,2568.53 3172,2580 v1(3261,2669) 3110.38,2669 3057.38,2616 2957.62,2616 2954.62,2613 2917.62,2613 2910,2620.62 2910,2631.38 2917.62,2639 2942.62,2639 3082.12,2778.5 3093.36,2778.5 3159.07,2844.21 3162.68,2844.21 3194.47,2876 3213.53,2876 3220.53,2883 3234.67,2883 3253.67,2902 3296.29,2902 3301.29,2907 3383,2907 3386.51,2910.51 3386.51,2914.9 3394.13,2922.51 3402.51,2922.51 3405,2925 3421,2925 v1(3432,2936)
  L6_HS2 w6: v1(3432,2936) 3420.07,2924.07 3420.07,2901.07 3430.9,2890.24 3436.17,2890.24 3448,2878.42 3448.97,2878.42 3461,2866.38 3461,2834.38 3480,2815.38 3480,2720 v1(3496,2704)
NetR84_1: R84.1 U1A.L4 | length 2486.3
  L1_TOP w2: v1(3460,2684) 3461.91,2682.09 3468.46,2682.09 U1A.L4@3479.54,2671.02
  L1_TOP w6: R84.1@2473,2625.44 2473,2588 v1(2481,2580)
  L3_HS1 w6: v1(2481,2580) 2288.61,2580 2220.99,2647.62 2220.99,2758.38 2228.61,2766 2511.19,2766 2514.19,2763 2529.19,2748 2543.33,2748 2674.33,2617 2855.11,2617 2880,2641.89 2880,2643.81 2940.19,2704 2955.14,2704 2963.53,2704 2977,2717.47 2977,2731.62 3009.82,2764.44 3009.82,2849.68 3062,2901.86 3062,2906.38 3070.62,2915 3182,2915 v1(3201,2934)
  L5_SIG w6: v1(3201,2934) 3201,2868.38 3182,2849.38 3182,2774 3173,2765 3173,2648.38 3170,2645.38 3170,2634.62 3187.12,2617.5 3213.36,2617.5 3229.79,2633.94 3229.79,2656.18 3278.62,2705 3288.62,2705 3308.62,2725 3319.38,2725 3334,2710.38 v1(3334,2630)
  L8_BOTTOM w6: v1(3334,2630) 3390.2,2630 3427.69,2667.49 3443.49,2667.49 v1(3460,2684)
NetR85_1: R85.1 U1A.T7 | length 6211.1
  L1_TOP w4: U1A.T7@3574.02,2513.54 3565.02,2504.54 3565.02,2470.02 3581,2454.04 3581,2440.03 3591,2430.03 v1(3591,2413) ; v1(4233.84,3363) 4233.84,3380.84 4241.16,3388.16 4300.58,3388.16 4318.75,3370 4319.73,3370 4338,3351.73 4338,3323.71 4350,3311.71 4350,3307.74 4363,3294.74 4363,3263.26 4355,3255.26 4355,2957.58 4366.18,2946.4 4370.82,2946.4 4382,2935.22 R85.1@4382,2915.44
  L3_HS1 w4: v1(3591,2413) 3588.84,2413 3583.84,2408 3571.03,2408 3529,2450.03 3529,2471.11 3509.11,2491 3436.05,2491 3417.05,2472 3368.25,2472 3358.25,2482 3347.25,2482 3329.25,2500 3300.31,2500 3297.96,2502.34 3297.96,2538.04 3289.66,2546.34 3289.66,2558.37 3274,2574.03 3274,2583.97 3281.03,2591 3290.97,2591 3295.95,2586.02 3325.02,2586.02 3397,2658 3397,2761.37 3428.1,2792.47 3430.55,2792.47 3445.07,2807 3445.07,2818.47 3476,2849.4 3476,2863.97 3488.03,2876 3497.97,2876 3502.09,2871.88 3518.48,2871.88 3522.6,2876 3593.03,2876 3608.03,2861 3622.06,2861 3632.06,2851 3672.95,2851 3681.04,2842.92 3681.04,2781.04 v1(3653,2753)
  L4_POWER w4: v1(3062.72,3440.02) 3061.91,3439.21 3061.91,3428.02 3056,3422.11 3056,3413.46 3020.54,3378 2943.89,3378 2931,3365.11 2931,3356.73 2923,3348.73 2923,3346 2922,3345 2922,3207 2942,3187 3049.11,3187 3071.11,3209 3091.97,3209 3099,3201.97 3099,3140 3124,3115 3124,3105.97 3134,3095.97 3134,3018.54 3140,3012.54 3179.54,2973 3287.75,2973 3300.75,2986 3521,2986 3541,2966 3577.92,2966 3600.99,2942.92 3600.99,2939.04 3608.05,2931.98 3608.05,2920.07 3621,2907.12 3621,2872.03 3610.13,2861.16 3610.13,2857.84 3624.49,2843.48 3624.49,2818.54 3631.12,2811.91 3631.12,2809.85 3660,2780.97 3660,2771.03 3653.97,2765 3653.97,2753.97 v1(3653,2753)
  L5_SIG w4: v1(3062.72,3440.02) 3059.28,3440.02 3124.44,3505.18 3247.15,3505.18 3289.97,3548 3347.63,3548 3349.63,3546 3377.6,3546 3380.6,3543 3415.4,3543 3418.4,3546 3802.03,3546 3833.66,3514.37 3905.82,3514.37 4009.19,3411 4059.11,3411 4275,3195.11 4275,3095.27 4345,3025.27 4345,2972.58 4315.22,2942.8 4315.22,2934.02 4259.52,2878.33 4153.33,2878.33 4089,2814 4089,2772.34 4091.34,2770 4131,2770 4199,2838 4244.65,2838 4363,2956.35 4363,3056.73 4293,3126.73 4293,3216.73 4233.84,3275.89 v1(4233.84,3363)
NetR86_1: R86.1 U1A.R7 | length 3883.6
  L1_TOP w2: v1(3567,2557) 3573.36,2550.64 3573.36,2545.69 U1A.R7@3574.02,2545.03
  L1_TOP w6: R86.1@4441,2916.44 4444.94,2916.44 4492,2869.38 v1(4492,2865)
  L3_HS1 w6: v1(3412,3371) 3532.38,3371 3609,3447.62 3609,3461 3657.81,3509.81 3657.81,3510.19 3664.62,3517 3675.38,3517 3685.38,3507 3784.62,3507 3789.62,3512 3817.53,3512 3842,3536.47 3842,3638 3852.5,3648.5 3890.57,3648.5 3892.07,3647 3930.14,3647 4241.14,3336 v1(4445,3336)
  L5_SIG w6: v1(4445,3336) 4445,2996 4209,2760 4209,2684.62 4220.13,2673.49 4227.49,2673.49 4311.51,2757.51 4311.51,2832.89 4327.62,2849 4333,2849 4351,2867 4470,2867 4472,2865 v1(4492,2865)
  L6_HS2 w6: v1(3412,3371) 3429,3354 3429,3334.24 3469.24,3294 3473.38,3294 3489,3278.38 3489,3276.33 3520.17,3245.17 3579.6,3245.17 3594.06,3230.7 3594.06,3227.37 3603.43,3218 3607.38,3218 3615,3210.38 3615,3199.62 3595.38,3180 3556.38,3180 3551.38,3175 3545.72,3175 3522.52,3151.8 3522.52,3138.13 3507.38,3123 3501,3123 3472,3094 3472,3042.67 3468.19,3038.86 3468.19,3029.81 3459.38,3021 3449,3021 3370,2942 3370,2926.67 3366.51,2923.18 3366.51,2816.16 3386,2796.67 3386,2654.89 3396.05,2644.84 3396.05,2581.05 3406,2571.1 3406,2558 3415,2549 3416.62,2549 3419.62,2546 3449.95,2546 3450.95,2547 3501.45,2547 3511.81,2557.36 3511.81,2562.64 3522.17,2573 3535.78,2573 3551.78,2557 v1(3567,2557)
NetR87_1: R87.1 U1A.P7 | length 1275.7
  L1_TOP w2: U1A.P7@3574.02,2576.53 3574.5,2577 v1(3576,2577)
  L1_TOP w4: v1(4023,2235) 4023,2251.44 R87.1@4026,2254.44
  L4_POWER w4: v1(3576,2577) 3575.03,2577 3567.03,2569 3562.03,2569 3555,2561.97 3555,2550.03 3532.97,2528 3511.09,2528 3484.06,2555.03 3484.06,2557.47 3463.54,2578 3427.03,2578 3413,2563.97 3413,2554.03 3420.03,2547 3464.84,2547 3501.84,2510 3654.88,2510 3658.11,2506.77 3808.49,2506.77 3814.72,2513 3831.28,2513 3832.78,2511.5 3850.5,2511.5 3908,2454 3911.31,2454 3925.17,2467.86 3925.17,2485.14 3939.03,2499 3962.97,2499 3970,2491.97 3970,2425.97 3948,2403.97 3948,2347.89 3906,2305.89 3906,2254 3925,2235 v1(4023,2235)
NetR89_1: R89.1 U1A.P8 | length 997.7
  L1_TOP w4: v1(3605.52,2576.53) 3606.83,2576.53 3613.31,2583 3620.04,2583 3633.94,2569.1 3703.63,2569.1 3730.54,2596 3828,2596 3838,2586 3838,2584.03 3853.5,2568.53 3860.8,2568.53 3869.27,2577 3872,2577 3881,2586 3913,2586 3918,2581 3957.72,2581 3965,2573.72 3965,2565.03 3972.03,2558 3984.16,2558 3986.51,2555.66 3986.51,2501.52 4011.03,2477 4033,2477 4043.15,2466.85 4043.15,2399.63 4002.28,2358.76 4002.28,2291.72 4009,2285 4036,2285 4049.72,2271.28 4049.72,2238.18 4032.13,2220.59 4025.48,2220.59 4007.89,2203 3994.03,2203 3982.03,2215 3978,2215 3955.34,2237.66 3941.78,2237.66 R89.1@3930,2249.44
NetR92_1: R92.1 U1A.R9 | length 1409.4
  L1_TOP w2: v1(3617,2565) U1A.R9@3637.02,2545.03
  L1_TOP w4: R92.1@3746,2118.44 3742.06,2118.44 3730.28,2130.22 3730.28,2149.29 3721,2158.58 3721,2194.11 3753.55,2226.66 3853.2,2226.66 3860.72,2234.18 3860.72,2266.71 3857.2,2270.22 3832.36,2270.22 3798,2304.58 3798,2314.77 3797,2315.77 3797,2349.27 3803,2355.27 3803,2388 3812,2397 v1(3812,2400)
  L3_HS1 w4: v1(3617,2565) 3617,2550.03 3571,2504.03 3532.85,2504.03 3498.88,2538 3457.88,2538 3456.88,2537 3415.89,2537 3413.89,2539 3367.34,2539 3365,2536.66 3365,2535.89 3352.11,2523 3334.11,2523 3327.5,2516.38 3327.5,2513.07 3350.57,2490 3361.57,2490 3371.57,2480 3413.74,2480 3432.74,2499 3512.43,2499 3569.43,2442 3578.97,2442 3608.77,2412.2 3608.77,2401.63 3621.4,2389 3704.97,2389 3709.97,2394 3728.97,2394 3732.82,2397.85 3734.97,2400 3745.97,2411 3780.43,2411 3791.43,2400 v1(3812,2400)
NetR93_2: R93.2 U1A.E7 | length 2317.1
  L1_TOP w4: v1(3571,2833) 3571,2835.16 3574.02,2838.19 U1A.E7@3574.02,2859.99
  L1_TOP w6: R93.2@4424.44,3171 4425,3170.44 v1(4425,3123)
  L3_HS1 w6: v1(3571,2833) 3571,2787.53 3587.53,2771 3617.5,2771 3622.5,2776 v1(3648,2776)
  L5_SIG w6: v1(3527,3433.31) 3819.85,3433.31 3824.09,3429.06 3824.09,3427.53 3831,3420.62 v1(3831,3419)
  L6_HS2 w6: v1(3527,3433.31) 3527,3354.33 3605.55,3275.78 3606.17,3275.78 3655,3226.95 3655,3210.95 3669.65,3196.3 3669.65,3137.37 3660.28,3128 3608.62,3128 3600,3119.38 3600,3117.37 3590.63,3108 3578.81,3108 3558.73,3087.91 3558.73,3074.66 3580,3053.38 3580,3030.62 3566.62,3017.23 3488,2938.62 3488,2894.47 3506,2876.47 3506,2846 3527,2825 3547.38,2825 3566.03,2806.35 3566.03,2781.61 3588.64,2759 3631,2759 v1(3648,2776)
  L8_BOTTOM w6: v1(3831,3419) 3943,3531 4023.38,3531 4246.5,3307.88 4246.5,3300.66 4424.16,3123 v1(4425,3123)
NetR148_2: R148.2 R149.1 T1.1 | length 1986.7
  L1_TOP w6: R148.2@598,1211.44 598.56,1210.88 R149.1@598.56,1165 v1(780,1165) ; v1(2361,1377) 2361.08,1376.92 2370.14,1376.92 2387.85,1359.21 2389.82,1359.21 T1.1@2398.63,1350.4
  L6_HS2 w6: v1(780,1165) 991.5,1165 997.5,1159 1792,1159 1892,1259 2068.62,1259 2093.62,1234 2244.38,1234 2361,1350.62 v1(2361,1377)
NetR155_2: R155.2 R160.1 T2.1 | length 126.2
  L1_TOP w6: R155.2@3415,1190.56 3486.94,1190.56 3502.78,1206.4 T2.1@3534.63,1206.4
NetR172_2: R172.2 T3.2 | length 84.5
  L1_TOP w6: R172.2@1786.56,1077 1809.34,1077 1833.48,1052.86 1833.48,1052.78 1841.67,1044.6 T3.2@1857.6,1044.6
NetR173_2: R173.2 T3.1 T4.3 | length 2511.3
  L1_TOP w4: T4.3@3023.34,1201 3033.34,1191 R173.2@3096.44,1191
  L1_TOP w6: T3.1@1857.6,1119.4 1878.32,1119.4 2116.92,1358 2179,1358 2210.11,1326.89 2210.11,1257.51 2350.84,1116.78 2849.22,1116.78 3237.37,728.63 3242.34,728.63 3281.87,768.16 3281.87,773.13 2957.96,1097.04 2957.96,1116.78 3021.37,1180.19 T4.3@3021.37,1201
NetR175_1: R175.1 R177.2 T4.1 | length 100.7
  L1_TOP w4: R175.1@2846,1228.56 R177.2@2896,1228.56 2905.84,1238.4 T4.1@2942.63,1238.4
NetR187_2: R187.2 R188.1 T5.1 | length 1931.5
  L1_TOP w6: R187.2@738,1109.56 499.31,1109.56 348,958.25 348,788.72 272.7,713.42 272.7,333.08 331.15,274.63 T5.1@1004.6,274.63 1004.6,231.78 1018.44,217.94 R188.1@1018.44,214
NetR208_2: R208.2 S4.3 S4.4 | length 1325.6
  L1_TOP w6: R208.2@2079.56,731 2079.56,727.06 2068.78,716.28 2051.12,716.28 1983.48,648.64 1882.64,648.64 1817.49,583.49 1817.49,577.32 1839.59,555.22 2077.94,555.22 2160.72,638.01 2399.07,638.01 2409.07,628.01 2413.99,628.01 2436.58,605.42 S4.4@2436.58,600.5 S4.3@2436.58,287.5
NetR210_2: R210.2 S3.3 S3.4 | length 707.6
  L1_TOP w6: R210.2@3915,651.56 3918.94,651.56 3929.72,640.78 3929.72,623.12 3939.72,613.12 3939.72,455.87 3811.43,327.58 S3.4@3806.5,327.58 S3.3@4119.5,327.58
NetR216_2: R216.2 R217.1 | length 51
  L1_TOP w6: R216.2@2961,2343.44 R217.1@3012,2343.44
NetR218_2: R218.2 R219.1 | length 50
  L1_TOP w6: R218.2@3062,2343.44 R219.1@3112,2343.44
NetR219_2: R219.2 RV1.2 | length 2819.5
  L1_TOP w6: v1(3090,2436) 3106.38,2436 3112,2430.38 R219.2@3112,2398.56
  L8_BOTTOM w6: RV1.2@1957,208 2003.84,254.84 2067.16,254.84 2959,1146.69 2959,1268.62 3025,1334.62 3025,1437.62 2999,1463.62 2999,1566.62 3005,1572.62 3005,1583.38 2996,1592.38 2996,1698.38 3090,1792.38 v1(3090,2436)
NetR224_1: R224.1 X5.3 | length 178
  L1_TOP w6: X5.3@1599.31,4010.88 1599.31,4008.91 1708.28,3899.94 1708.28,3897.22 1719.06,3886.44 R224.1@1723,3886.44
NetR224_2: R224.2 ST1A.G1 | length 121.7
  L1_TOP w6: R224.2@1723,3941.56 1726.94,3941.56 1772.15,3986.77 ST1A.G1@1825.05,3986.77 ST1A.G1@1825.05,3985.86
NetR226_1: R226.1 R227.1 ST1A.N3 | length 1073.9
  L1_TOP w6: R226.1@956.56,3585 1000.56,3585 R227.1@1005,3580.56 v1(1005,3634) ; v1(1865,3795) 1865,3810.42 1870.54,3815.96 1870.54,3826.81 1876.23,3832.49 ST1A.N3@1876.23,3833.23
  L8_BOTTOM w6: v1(1005,3634) 1042,3671 1742,3671 1865,3794 v1(1865,3795)
NetR231_2: R231.2 ST1A.J15 | length 207.4
  L1_TOP w6: ST1A.J15@2183.31,3935.59 2184.89,3935.59 2190.57,3929.91 2191.56,3929.91 2198.91,3922.55 2224.45,3922.55 v1(2225,3922) 2374.44,3922 R231.2@2382,3914.44
NetR232_2: R232.2 X5.1 | length 70.2
  L1_TOP w6: R232.2@1543.44,4131 1543.44,4127.06 1556,4114.5 X5.1@1556,4066
NetR233_2: R233.2 ST1A.L4 | length 1021.7
  L1_TOP w6: R233.2@1055,3580.56 1302.31,3580.56 1494.75,3773 1739.62,3773 1784.25,3817.64 1837.22,3817.64 1840.73,3821.15 1840.73,3862.92 1846.53,3868.72 1886.13,3868.72 1901.28,3883.87 ST1A.L4@1901.82,3884.41 ; ST1A.L4@1901.86,3883.3 1907.04,3883.3 1907.08,3883.26 1924.8,3883.26 v1(1925.95,3884.41)
NetSB3_2: SB3.2 SB4.2 SB5.2 U1A.E16 | length 11856.7
  L1_TOP w4: U1A.E16@3857.49,2859.99 3876.49,2878.99 3900.65,2878.99 3904.15,2875.5 3916.79,2875.5 3925.29,2866.99 3942.26,2866.99 3944.72,2864.53 3952.47,2864.53 v1(3954,2863)
  L1_TOP w6: SB5.2@885,386 893,394 920.86,394 982.27,332.59 1056.71,332.59 1112.12,388 SB3.2@1181,388 ; SB3.2@1186,380 1194,388 1219.31,388 1224,383.31 1224,306.49 1214.51,297 1066.28,297 1052.78,283.5 1052.78,193.38 1056.88,189.28 1252.65,189.28 1279.37,216 1477,216 1497,196 1782.14,196 1806.14,172 3058.69,172 3079.69,193 3697,193 3783,107 5302,107 5503,308 5503,1070.14 6052.72,1619.86 6052.72,1805.32 ; v1(6075,2039) 6003.28,1967.28 6003.28,1805.32 6007.38,1801.22 6048.62,1801.22 6052.72,1805.32 ; SB4.2@6177.49,2001.02 6107.18,2001.02 6103.67,1997.5 6103.67,1856.27 6052.72,1805.32
  L3_HS1 w6: v1(4116,2739) 4116,2652.38 4108,2644.38 4108,2633.62 4113.83,2627.79 4113.83,2610.46 4119.66,2604.63 4124.63,2604.63 4209,2689 4209,2695.38 4216.62,2703 4241.5,2703 4327,2617.5 4327,2613.86 4360.86,2580 4371.38,2580 4379,2572.38 4379,2561.62 4371.38,2554 4360.62,2554 4358.6,2556.02 4353.51,2556.02 4350,2552.5 4350,2544.62 4351.76,2542.86 4355,2539.62 4373.62,2521 4375.38,2521 4383,2513.38 4383,2510.86 4424.55,2469.31 4432.83,2469.31 4458.76,2495.24 4458.76,2509.38 4540.31,2590.92 4540.31,2732.69 4634.62,2827 4648.76,2827 4659.38,2837.62 4659.38,2839.38 v1(4693,2873) ; v1(4922,2407) 5288.62,2407 5656.62,2039 v1(6075,2039)
  L6_HS2 w6: v1(3954,2863) 3965,2852 3965,2778.61 3945,2758.62 3945,2736.89 3915.78,2707.67 3915.78,2688.3 3916,2688.08 3916,2668.72 3893.28,2646 3876.72,2646 3870.81,2646 3860.81,2656 3853.86,2656 3849,2660.86 3849,2712.33 3868,2731.33 3868,2743.14 3889,2764.14 3889,2803.81 3887,2805.81 3887,2942.62 3918.37,2973.99 3949.1,2973.99 3953.11,2978 3985.28,2978 4034,2929.28 4034,2886.19 4029,2881.19 4029,2846.62 4116,2759.62 v1(4116,2739)
  L8_BOTTOM w6: v1(4693,2873) 4701,2865 4701,2864.8 4807.07,2758.74 4807.07,2521.93 v1(4922,2407)
NetSB26_2: SB26.2 SB29.2 U1A.U11 | length 4875.4
  L1_TOP w6: SB26.2@3047,3250 3048.34,3250 3060,3238.34 v1(3060,3229) ; v1(3591,2111) 3589.86,2111 3572,2128.86 3572,2213 3521,2264 SB29.2@3521,2319 3521,2329.34 3550.66,2359 3620,2359 3670.15,2409.15 3670.15,2418.55 3672,2420.4 3672,2423.02 3680,2431.02 3680,2431.7 3687,2438.7 3687,2446.14 3689,2448.14 3689,2457.84 3696,2464.84 3696,2465.26 3699.46,2468.72 3699.46,2481.49 U1A.U11@3700.01,2482.04
  L5_SIG w6: v1(1884,1962) 1837,2009 1837,3013.38 2048.62,3225 2551.5,3225 2555.5,3229 v1(3060,3229) ; v1(2150.15,1785) 2793.38,1785 2982.38,1974 3147.38,1974 3161.38,1988 3177.14,1988 3198.14,2009 3406.59,2009 3508.59,2111 v1(3591,2111)
  L8_BOTTOM w6: v1(1884,1962) 1884,1903.62 2002.62,1785 v1(2150.15,1785)
  other v1: 3669,2408
NetSB27_2: SB27.2 SB30.2 U1A.D17 | length 1459.2
  L1_TOP w6: v1(3522,3290) 3522,3310.53 3551,3339.53 SB30.2@3551,3383 ; v1(3546,3188) 3571.63,3213.63 3571.63,3218.19 3590.44,3237 SB27.2@3603,3237 ; U1A.D17@3888.98,2891.49 3889.53,2890.94 3901.43,2890.94 3907.88,2884.5 3923.13,2884.5 3928.64,2878.99 v1(3930.26,2878.99)
  L4_POWER w6: v1(3522,3290) 3522,3212 v1(3546,3188)
  L5_SIG w6: v1(3546,3188) 3565.47,3188 3567.47,3190 3605.38,3190 3618.38,3203 3697.53,3203 3719,3224.47 3719,3274.38 3767.62,3323 3774,3323 3816,3365 3932.14,3365 3950,3347.14 3950,3239.53 3981,3208.53 3981,3172.35 3993.55,3159.79 3996.88,3159.79 4043,3113.67 4043,3086.33 4025.67,3069 3997.62,3069 3988,3059.38 3988,3004.85 3978,2994.85 3978,2879.51 3974.49,2876 3956.15,2876 3953.15,2878.99 v1(3930.26,2878.99)
NetSB28_2: SB28.2 SB31.2 U1A.A7 | length 1024.7
  L1_TOP w6: v1(3567,3036) 3567,2993 U1A.A7@3574.02,2985.98
  L1_TOP w8: v1(2967,3079) 2971.73,3079 3056.73,3164 SB28.2@3067,3164 ; SB31.2@3285,3155 3276,3164 3276,3188.73 3281.27,3194 3325,3194 3334,3203 v1(3346,3203)
  L3_HS1 w8: v1(2967,3079) 3003,3115 3258,3115 v1(3346,3203)
  L4_POWER w8: v1(3346,3203) 3436,3113 3449.59,3113 3485.79,3076.8 3507,3076.8 3507,3072.2 3543.2,3036 v1(3567,3036)
NetSB32_2: SB32.2 SB33.2 U1A.A6 U1A.C17 U1A.U12 | length 3280.2
  L1_TOP w6: v1(2989,2828) 2989,2834 2999.34,2834 3026,2860.66 SB33.2@3026,2871 ; SB32.2@3134,2618 3148.62,2618 3172.12,2594.5 3182.88,2594.5 3196,2607.62 3196,2651.31 3192,2655.31 3192,2699 3196,2703 v1(3196,2729) ; v1(3520.2,3096.8) 3543,3074 v1(3543,3056) 3542.76,3055.76 3542.76,2986.68 U1A.A6@3542.53,2986.45 ; v1(3720,2445) 3731.5,2456.5 U1A.U12@3731.5,2482.04 ; U1A.C17@3888.98,2922.98 3924.63,2922.98 3930.62,2917 3938.38,2917 v1(3941.38,2914) 3968.2,2940.83 3994.44,2940.83 4029.62,2976 4037.73,2976 4065.29,3003.56 4065.29,3006.29 v1(4094,3035)
  L3_HS1 w6: v1(3363.6,2503.6) 3368,2508 3516.15,2508 3529.12,2495.03 3620.36,2495.03 3670.38,2445 v1(3720,2445) ; v1(3520.2,3096.8) 3534,3083 3626.57,3083 3629.57,3086 3649.38,3086 3651.38,3088 3691.81,3088 3703.81,3076 3780.33,3076 3781.33,3077 3826.69,3077 3828.69,3075 3846.28,3075 3848.28,3077 3950.14,3077 3952.14,3075 4020.36,3075 4022.35,3077 4028.39,3077 4070.38,3035 v1(4094,3035)
  L4_POWER w2: v1(3196,2729) 3221.3,2729 3227.3,2735 3300.44,2735 3312.44,2723 3318.56,2723 3325,2716.56 3325,2659.18 3307,2641.18 3307,2633.13 3296.68,2622.81 3296.68,2603.47 3286.72,2593.51 3284.96,2593.51 3275,2583.56 3275,2574.44 3292.44,2557 3306.56,2557 3314.53,2564.97 3314.53,2599.32 3323,2607.79 3323,2634.56 3329.44,2641 3338.56,2641 3363.6,2615.96 v1(3363.6,2503.6)
  L4_POWER w6: v1(2989,2828) 3016,2801 3124,2801 v1(3196,2729)
  L8_BOTTOM w6: v1(3196,2729) 3204.41,2720.59 3224.21,2720.59 3226.62,2723 3238.49,2723 3244,2728.51 3244,2768.98 3245,2769.98 3245,2796.14 3242,2799.14 3242,2805 3222,2825 3209.62,2825 3191,2843.62 3191,2856 3188,2859 3188,2939.38 3191,2942.38 3191,2985.53 3218,3012.53 3218,3026.67 3237.33,3046 3240.62,3046 3259.62,3065 3298.62,3065 3368.62,3135 3482,3135 v1(3520.2,3096.8)
NetSB35_2: SB35.2 U1A.G17 | length 5531.4
  L1_TOP w6: v1(2808,3079) 2899,2988 2905.51,2988 2923.01,2970.5 2941.34,2970.5 2953,2958.84 SB35.2@2953,2951 ; U1A.G17@3888.98,2797 3888.44,2796.45 3875.71,2796.45 3848.49,2769.23 3848.49,2761.78 3853.76,2756.5 3865.84,2756.5 3884.84,2775.51 3893.13,2775.51 3893.36,2775.28 3921.34,2775.28 3929.62,2767 3940.38,2767 3950.85,2777.47 3950.85,2782.85 v1(3952,2784) 3952.37,2783.63 4106,2783.63 4110.38,2788 v1(4112,2788)
  L5_SIG w6: v1(2808,3079) 2928,3199 3025.62,3199 3038.62,3212 3075.38,3212 3128.91,3265.52 3128.91,3274.48 3113.38,3290 2025.62,3290 1950,3365.62 1950,3564 1973,3587 2738.33,3587 2753.83,3602.5 2930.38,3602.5 2956.38,3628.5 3193.97,3628.5 3259.47,3563 3298.33,3563 3304.33,3557 3351.36,3557 3353.36,3555 3381.33,3555 3384.33,3552 3411.67,3552 3422.67,3563 3822.38,3563 3846.01,3539.37 3957.63,3539.37 4284,3213 4284,3099 4329,3054 4349.49,3054 4354,3049.49 4354,2968.85 4324.22,2939.07 4324.22,2930.29 4240.92,2847 4156,2847 4112,2803 v1(4112,2788)
PA0: R209.2 R236.1 U1A.N5 | length 6396.5
  L1_TOP w4: U1A.N5@3511.03,2608.02 3512,2607.06 v1(3512,2606)
  L1_TOP w6: R209.2@2074.56,899 2147,899 v1(2169,921) ; v1(3324,2257) 3311.8,2269.2 3311.8,2272.2 3300.76,2283.24 3287.76,2283.24 3263.66,2307.34 3263.66,2354.8 3313.86,2405 3427.47,2405 3436.47,2414 3465.62,2414 3470.62,2409 3506.28,2409 3507.28,2410 3516.38,2410 3529.03,2422.65 3529.03,2538.97 v1(3528,2540) ; R236.1@3942.44,1178 3934.44,1186 v1(3893,1186) 3893,1291.58 3879.63,1304.95 3879.63,1319.1 3869.67,1329.06 3855.53,1329.06 3822.58,1362 3336.67,1362 3298.75,1324.08 3231.22,1324.08 3218.21,1324.08 3202.39,1308.26 3202.39,1295.25 3202.39,1294.12 3164.27,1256 3137,1256 3130,1263 3093.72,1263 3084.35,1272.37 3084.35,1419.29 3093.72,1428.66 3139.76,1428.66 3142.45,1431.35 3286.79,1431.35 3299.86,1418.28 3907.38,1418.28 4001.14,1512.05 v1(4001.14,1938.14)
  L5_SIG w6: v1(3512,2606) 3512,2549.46 3516.07,2545.39 3520.99,2545.39 3526.38,2540 v1(3528,2540)
  L6_HS2 w6: v1(2169,921) 2434,1186 v1(3893,1186)
  L8_BOTTOM w6: v1(3324,2257) 3338,2243 3435.02,2243 3438.02,2246 3522.51,2246 3531.51,2255 3601.71,2255 3609.95,2246.76 3713.97,2246.76 3751.73,2209 3819.27,2209 3850.27,2240 3927.1,2240 3934.75,2232.34 3969.67,2232.34 3985.33,2248 4001.82,2248 4013.47,2258 4078.96,2303 4083.93,2303 4087.45,2299.48 4087.45,2240.83 4080,2233.38 4080,2139.57 4007,2066.57 4007,2011.6 4001.14,2005.74 v1(4001.14,1938.14)
PA0_C: M29.16 SB20.2 U1A.T1 | length 4076.3
  L1_TOP w6: M29.16@2156.5,2354 v1(2235,2354) ; SB20.2@3208,2301 3215.84,2301 3227.5,2289.34 3227.5,2245.14 3315,2157.64 v1(3315,2110) ; v1(3309,2448) 3310.62,2448 3314.62,2452 3328.62,2452 3339.62,2463 3380.15,2463 3395.05,2477.9 3395.05,2503.54 U1A.T1@3385.05,2513.54
  L4_POWER w6: v1(3309,2448) 3207.64,2448 3084.03,2324.39 3084.03,2318.61 3018.91,2253.48 3018.91,2252.62 2985.47,2219.19 2984.62,2219.19 2961.43,2196 2956.3,2196 2915,2154.7 2915,2137.3 2948.3,2104 3281,2104 3287,2110 v1(3315,2110)
  L5_SIG w6: v1(2235,2354) 2198,2317 1963.9,2317 1954,2326.9 1954,2897.57 2004.43,2948 3124.49,2948 3133,2939.49 3133,2664.95 3130,2661.95 3130,2618.05 3133,2615.05 3133,2581.86 3197.86,2517 3198.81,2517 3224,2491.81 3224,2490.86 3266.86,2448 v1(3309,2448)